# Altium PCB 261114-MH1.25-4P-30mm.PcbDoc
Units mm, origin at the board's own origin, x right, y up, seen from the top; angles counter-clockwise.
Board outline 30 x 30 mm, 2 copper layers (Top Layer, Bottom Layer); 4 components, 0 nets, 24 pads, 24 vias.
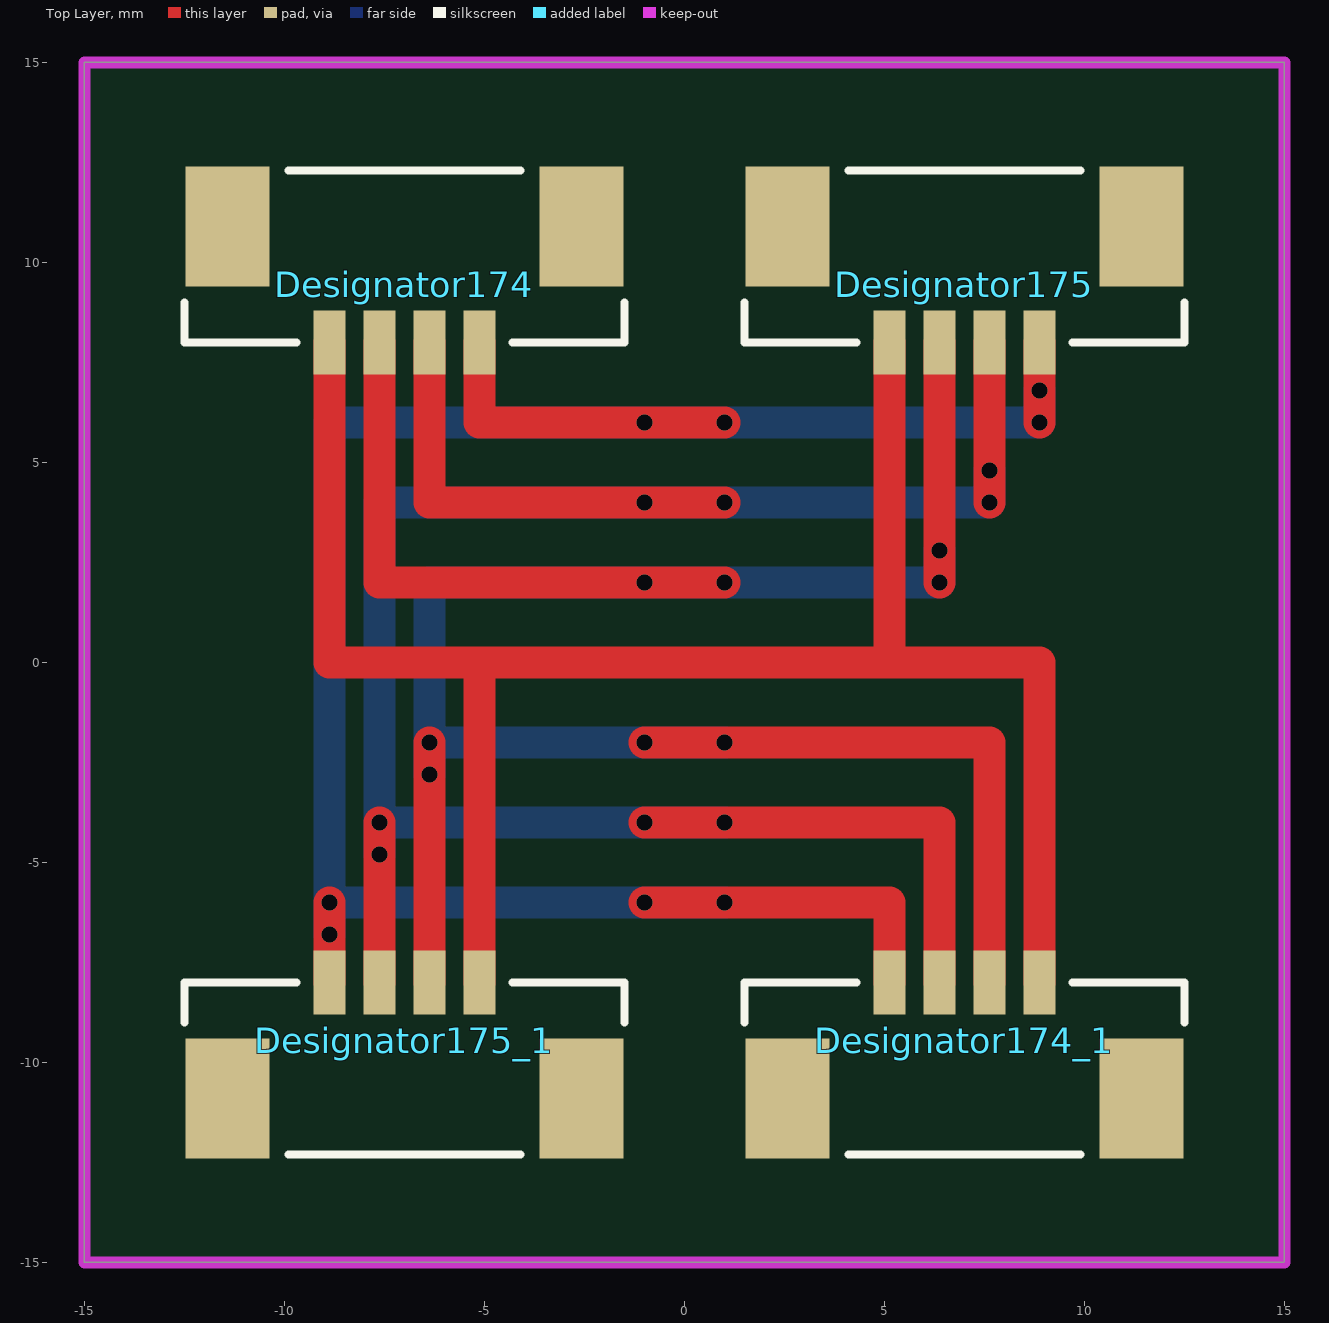
[diagram p0: Top Layer view]
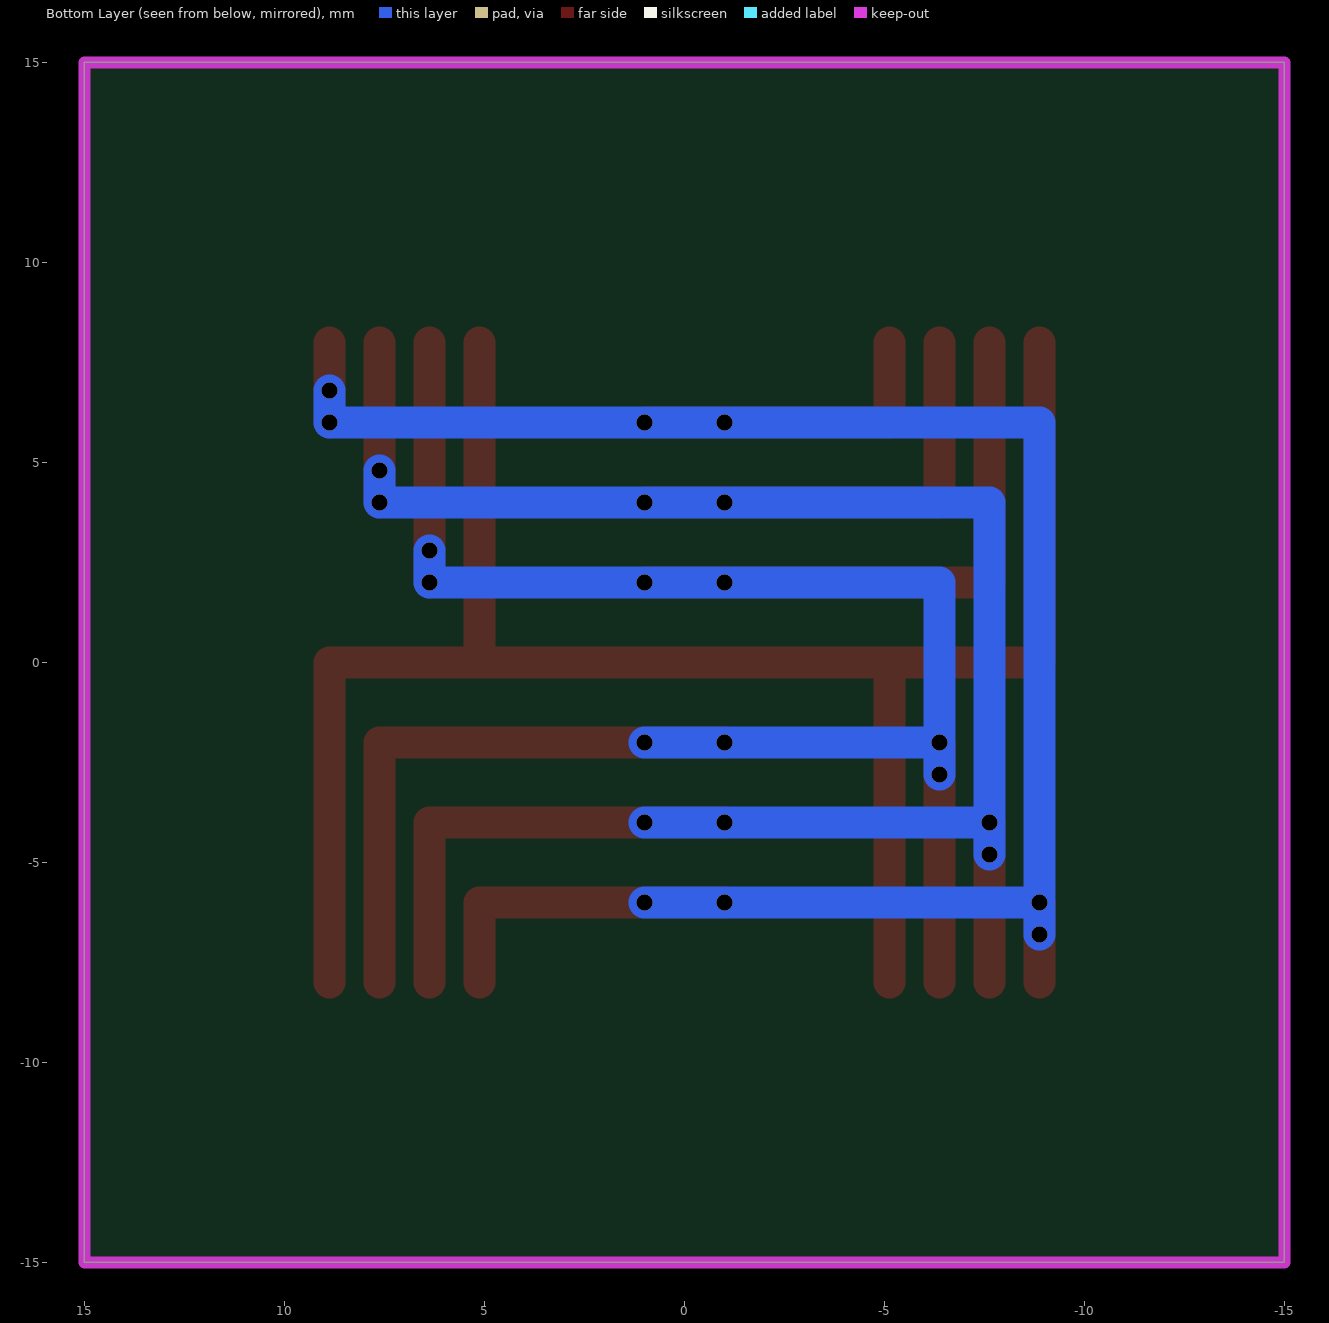
[diagram p1: Bottom Layer view, seen from below]

## Layer stack, top to bottom
Top Solder: solder mask 0.0102, Solder Resist, Dk 3.5
Top Layer: signal copper 0.0356
Dielectric 1: dielectric 0.32, FR-4, Dk 4.8
Bottom Layer: signal copper 0.0356
Bottom Solder: solder mask 0.0102, Solder Resist, Dk 3.5

## Board outline
-15,-15 15,-15 15,15 -15,15

## Design rules (kind name [scope] priority, off if disabled: settings)
Clearance [All] p1: gap=0.254
PolygonConnect [All] p1: connectstyle=Relief reliefconductorwidth=0.254 reliefentries=4 polygonreliefangle="90 Angle" airgapwidth=0.254
RoutingVias [All] p1: holewidth=0.711 width=1.27 viastyle="Through Hole" minholewidth=0.711 minwidth=1.27 maxholewidth=0.711 maxwidth=1.27
SolderMaskExpansion [All] p1: expansion=0.102
Width [All] p1: maxlimit=0.254 minlimit=0.254 preferedwidth=0.254
30 further rules are at their usual default settings.

## Components (designator, comment, footprint, x,y, rotation, side; value= is the part's Value field where it differs from the comment)
Designator174 "Comment" MH1.25-4P -7,8 r180 top
Designator174_1 "Comment" MH1.25-4P 7,-8 r0 top
Designator175 "Comment" MH1.25-4P 7,8 r180 top
Designator175_1 "Comment" MH1.25-4P -7,-8 r0 top

## Footprints (in the part's own frame and the unit in brackets; to place one, negate y for a bottom-side part, rotate by r counter-clockwise, add the part's x,y. Pads: shape width x height; smd on the part's side, far side on the other; paste and mask are expansions set on the pad)
MH1.25-4P [mm]
  rect 2.1x3 smd mask+0: 2(-4.425,-2.9) 2(4.425,-2.9)
  rect 0.8x1.6 smd mask+0: 2(-1.875,0) 2(-0.625,0) 2(0.625,0) 2(1.875,0)
  silkscreen extent -5.5,-4.3 5.5,0

## Via types
v1: diameter 0.4, hole 0.4, Top Layer to Bottom Layer, tented both sides, 24 vias

## Nets (pads, with @x,y where several pads share a name; then routed paths per layer and width w, separated by ;. In a path a pad name is that pad's centre, name@x,y a point inside that pad or via, vN(x,y) a via of type N, cw(c..) or ccw(c..) an arc to the next point about the centre after c; other vN are vias at no path point)
pads on no net: Designator174.2 Designator174_1.2 Designator175.2 Designator175_1.2
copper on no net: | length 252.7
  Top Layer w0.8: -8.875,-8 v1(-8.875,-6) ; -8.875,8 -8.875,0 5.125,0 5.125,8 ; -7.625,-8 v1(-7.625,-4) ; -7.625,8 -7.625,2 v1(1,2) ; -6.375,-8 v1(-6.375,-2) ; -6.375,8 -6.375,4 v1(1,4) ; -5.125,-8 -5.125,0 8.875,0 8.875,-8 ; -5.125,8 -5.125,6 v1(1,6) ; v1(-1,-6) 5.125,-6 5.125,-8 ; v1(-1,-4) 6.375,-4 6.375,-8 ; v1(-1,-2) 7.625,-2 7.625,-8 ; v1(6.375,2) 6.375,8 ; v1(7.625,4) 7.625,8 ; v1(8.875,6) 8.875,8
  Bottom Layer w0.8: v1(-8.875,-6.8) v1(-8.875,-6) ; v1(-7.625,-4.8) v1(-7.625,-4) ; v1(-6.375,-2.8) v1(-6.375,-2) ; v1(1,-6) v1(-8.875,-6) ; v1(1,-4) v1(-7.625,-4) ; v1(1,-2) v1(-6.375,-2) ; v1(6.375,2.8) v1(6.375,2) -6.375,2 v1(-6.375,-2) ; v1(7.625,4.8) v1(7.625,4) -7.625,4 v1(-7.625,-4) ; v1(8.875,6.8) v1(8.875,6) -8.875,6 v1(-8.875,-6)
  other v1: -1,2 -1,4 -1,6

## Keep-outs
Keep-Out Layer:
  the board outline again, w0.3